# Altium PCB ledcube_v2.PcbDoc (part 12 of 18)
Units mil, origin at the board's own origin, x right, y up, seen from the top; angles counter-clockwise.
Board outline 3130 x 3300 mil, 2 copper layers (Top Layer, Bottom Layer); 188 components, 216 nets, 29515 pads, 250 vias.
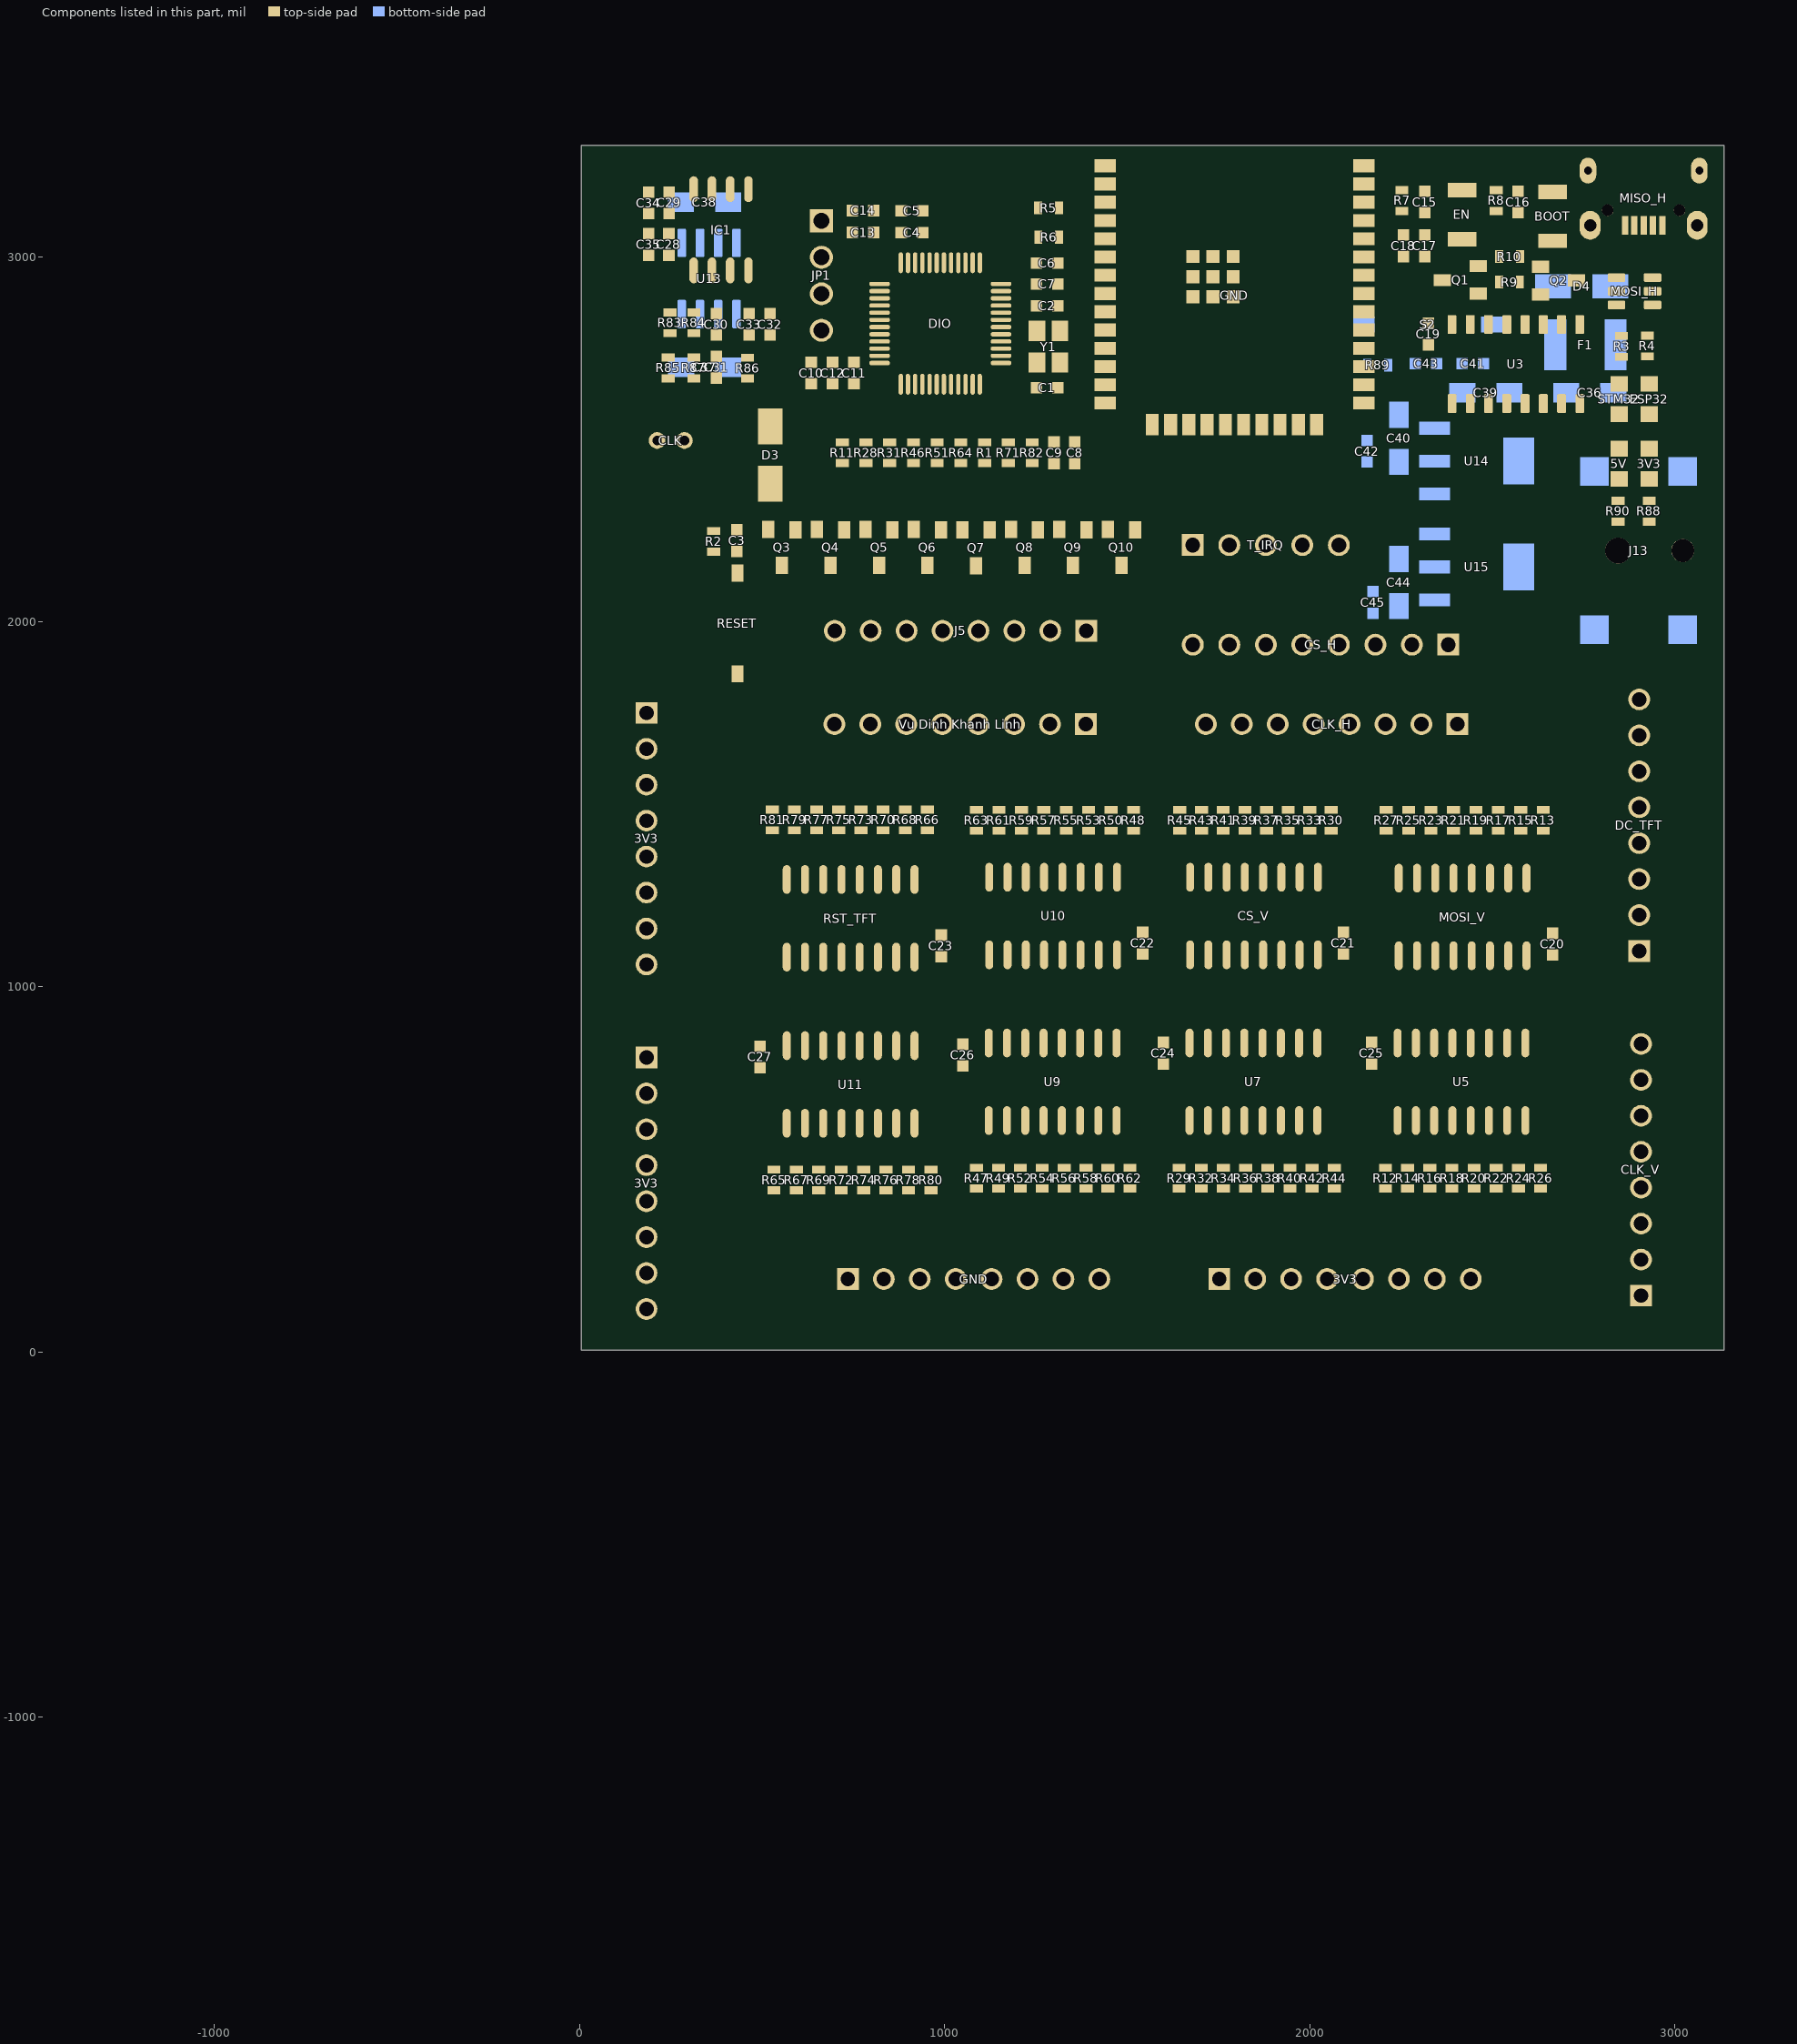
[diagram p11: the components of this part, seen from the top]

## Free pads (board coordinates) (continued)
  round 0 on Mech16: 1(-1372.03,-1736.73) 1(-1372.03,-1737.11) 1(-1372.03,-1737.11) 1(-1372.03,-1736.98) 1(-1372.03,-1736.98) 1(-1372.03,-1736.96) 1(-1372.03,-1736.96) 1(-1372.03,-1736.92) 1(-1372.03,-1736.92) 1(-1372.03,-1736.91) 1(-1372.03,-1736.91) 1(-1372.03,-1736.87) 1(-1372.03,-1736.87) 1(-1372.03,-1736.85) 1(-1372.03,-1736.85) 1(-1372.03,-1737.21) 1(-1372.03,-1737.21) 1(-1372.03,-1736.68) 1(-1372.03,-1736.68) 1(-1372.03,-1736.68) 1(-1372.03,-1736.68) 1(-1372.03,-1736.82) 1(-1372.03,-1736.82) 1(-1372.03,-1736.69) 1(-1372.03,-1736.69) 1(-1372.03,-1736.96) 1(-1372.03,-1736.96) 1(-1372.03,-1736.95) 1(-1372.03,-1736.95) 1(-1372.03,-1736.9) 1(-1372.03,-1736.9) 1(-1372.03,-1736.9) 1(-1372.03,-1736.9) 1(-1372.03,-1736.85) 1(-1372.03,-1736.85) 1(-1372.03,-1736.84) 1(-1372.03,-1736.84) 1(-1372.03,-1737.21) 1(-1372.03,-1737.21) 1(-1372.03,-1737.1) 1(-1372.03,-1737.1) 1(-1372.03,-1737.09) 1(-1372.03,-1737.09) 1(-1372.03,-1736.73) 1(-1372.03,-1736.73) 1(-1372.03,-1737.23) 1(-1372.03,-1737.23) 1(-1372.03,-1736.81) 1(-1372.03,-1736.81) 1(-1372.03,-1736.79) 1(-1372.03,-1736.79) 1(-1372.03,-1736.76) 1(-1372.03,-1736.76) 1(-1372.03,-1736.74) 1(-1372.03,-1736.74) 1(-1372.03,-1737.11) 1(-1372.03,-1737.11) 1(-1372.03,-1737.04) 1(-1372.03,-1737.04) 1(-1372.03,-1737.02) 1(-1372.03,-1737.02) 1(-1372.03,-1736.71) 1(-1372.03,-1736.71) 1(-1372.03,-1737.01) 1(-1372.03,-1737.01) 1(-1372.03,-1737.24) 1(-1372.03,-1737.24) 1(-1372.03,-1737.11) 1(-1372.03,-1737.11) 1(-1372.03,-1736.81) 1(-1372.03,-1736.81) 1(-1372.03,-1736.8) 1(-1372.03,-1736.8) 1(-1372.03,-1736.76) 1(-1372.03,-1736.76) 1(-1372.03,-1736.75) 1(-1372.03,-1736.75) 1(-1372.03,-1737.02) 1(-1372.03,-1737.02) 1(-1372.03,-1737.01) 1(-1372.03,-1737.01) 1(-1372.03,-1737.08) 1(-1372.03,-1737.08) 1(-1372.03,-1737.08) 1(-1372.03,-1737.08) 1(-1372.03,-1736.8) 1(-1372.03,-1736.8) 1(-1372.03,-1736.79) 1(-1372.03,-1736.79) 1(-1372.03,-1736.74) 1(-1372.03,-1736.74) 1(-1372.03,-1736.74) 1(-1372.03,-1736.74) 1(-1372.03,-1736.69) 1(-1372.03,-1736.69) 1(-1372.03,-1737.25) 1(-1372.03,-1737.25) 1(-1372.03,-1737.1) 1(-1372.03,-1737.1) 1(-1372.03,-1737.09) 1(-1372.03,-1737.09) 1(-1372.03,-1737.2) 1(-1372.03,-1737.2) 1(-1372.03,-1737.04) 1(-1372.03,-1737.04) 1(-1372.03,-1737.02) 1(-1372.03,-1737.02) 1(-1372.03,-1736.82) 1(-1372.03,-1736.82) 1(-1372.03,-1736.8) 1(-1372.03,-1736.8) 1(-1372.03,-1736.77) 1(-1372.03,-1736.77) 1(-1372.03,-1736.75) 1(-1372.03,-1736.75) 1(-1372.03,-1737.25) 1(-1372.03,-1737.25) 1(-1372.03,-1737.09) 1(-1372.03,-1737.09) 1(-1372.03,-1737.08) 1(-1372.03,-1737.08) 1(-1372.03,-1737.03) 1(-1372.03,-1737.03) 1(-1372.03,-1737.01) 1(-1372.03,-1737.01) 1(-1372.03,-1736.98) 1(-1372.03,-1736.98) 1(-1372.03,-1736.96) 1(-1372.03,-1736.96) 1(-1372.03,-1736.96) 1(-1372.03,-1736.96) 1(-1372.03,-1736.95) 1(-1372.03,-1736.95) 1(-1372.03,-1736.92) 1(-1372.03,-1736.92) 1(-1372.03,-1736.9) 1(-1372.03,-1736.9) 1(-1372.03,-1736.9) 1(-1372.03,-1736.9) 1(-1372.03,-1736.9) 1(-1372.03,-1736.9) 1(-1372.03,-1736.87) 1(-1372.03,-1736.87) 1(-1372.03,-1736.85) 1(-1372.03,-1736.85) 1(-1372.03,-1736.85) 1(-1372.03,-1736.85) 1(-1372.03,-1736.84) 1(-1372.03,-1736.84) 1(-1372.03,-1737.12) 1(-1372.03,-1737.12) 1(-1372.03,-1737.12) 1(-1372.03,-1737.12) 1(-1372.03,-1737.13) 1(-1372.03,-1737.13) 1(-1372.03,-1737.25) 1(-1372.03,-1737.25) 1(-1372.03,-1737.2) 1(-1372.03,-1737.2) 1(-1372.03,-1737.13) 1(-1372.03,-1737.13) 1(-1372.03,-1737.12) 1(-1372.03,-1737.12) 1(-1372.03,-1737.13) 1(-1372.03,-1737.13) 1(-1372.03,-1737.24) 1(-1372.03,-1737.24) 1(-1372.03,-1736.8) 1(-1372.03,-1736.8) 1(-1372.03,-1737.23) 1(-1372.03,-1737.23) 1(-1372.03,-1737.12) 1(-1372.03,-1737.12) 1(-1372.03,-1737.09) 1(-1372.03,-1737.09) 1(-1372.03,-1737.08) 1(-1372.03,-1737.08) 1(-1372.03,-1737.03) 1(-1372.03,-1737.03) 1(-1372.03,-1736.82) 1(-1372.03,-1736.82) 1(-1372.03,-1736.8) 1(-1372.03,-1736.8) 1(-1372.03,-1736.77) 1(-1372.03,-1736.77) 1(-1372.03,-1736.75) 1(-1372.03,-1736.75) 1(-1372.03,-1736.74) 1(-1372.03,-1736.74) 1(-1372.03,-1736.74) 1(-1372.03,-1736.74) 1(-1372.03,-1737.01) 1(-1372.03,-1737.01) 1(-1372.03,-1736.98) 1(-1372.03,-1736.98) 1(-1372.03,-1736.96) 1(-1372.03,-1736.96) 1(-1372.03,-1736.92) 1(-1372.03,-1736.92) 1(-1372.03,-1736.9) 1(-1372.03,-1736.9) 1(-1372.03,-1736.87) 1(-1372.03,-1736.87) 1(-1372.03,-1736.85) 1(-1372.03,-1736.85) 1(-1372.03,-1736.79) 1(-1372.03,-1736.79) 1(-1372.03,-1737.13) 1(-1372.03,-1737.13) 1(-1372.03,-1737.01) 1(-1372.03,-1737.01) 1(-1372.03,-1737.04) 1(-1372.03,-1737.04) 1(-1372.03,-1737.02) 1(-1372.03,-1737.02) 1(-1372.03,-1737.1) 1(-1372.03,-1737.1) 1(-1372.03,-1737.09) 1(-1372.03,-1737.09) 1(-1372.03,-1736.96) 1(-1372.03,-1736.96) 1(-1372.03,-1736.95) 1(-1372.03,-1736.95) 1(-1372.03,-1736.9) 1(-1372.03,-1736.9) 1(-1372.03,-1736.9) 1(-1372.03,-1736.9) 1(-1372.03,-1736.85) 1(-1372.03,-1736.85) 1(-1372.03,-1736.84) 1(-1372.03,-1736.84) 1(-1372.03,-1737.17) 1(-1372.03,-1737.17) 1(-1372.03,-1737.08) 1(-1372.03,-1737.08) 1(-1372.03,-1737.08) 1(-1372.03,-1737.08) 1(-1372.03,-1737.01) 1(-1372.03,-1737.01) 1(-1372.03,-1736.98) 1(-1372.03,-1736.98) 1(-1372.03,-1736.96) 1(-1372.03,-1736.96) 1(-1372.03,-1736.92) 1(-1372.03,-1736.92) 1(-1372.03,-1736.91) 1(-1372.03,-1736.91) 1(-1372.03,-1736.87) 1(-1372.03,-1736.87) 1(-1372.03,-1736.85) 1(-1372.03,-1736.85) 1(-1372.03,-1737.04) 1(-1372.03,-1737.04) 1(-1372.03,-1737.02) 1(-1372.03,-1737.02) 1(-1372.03,-1737.1) 1(-1372.03,-1737.1) 1(-1372.03,-1737.09) 1(-1372.03,-1737.09) 1(-1372.03,-1736.82) 1(-1372.03,-1736.82) 1(-1372.03,-1736.8) 1(-1372.03,-1736.8) 1(-1372.03,-1736.8) 1(-1372.03,-1736.8) 1(-1372.03,-1736.77) 1(-1372.03,-1736.77) 1(-1372.03,-1736.75) 1(-1372.03,-1736.75) 1(-1372.03,-1737.11) 1(-1372.03,-1737.11) 1(-1372.03,-1737.11) 1(-1372.03,-1737.11) 1(-1372.03,-1737.01) 1(-1372.03,-1737.01) 1(-1372.03,-1736.74) 1(-1372.03,-1736.74) 1(-1372.03,-1736.74) 1(-1372.03,-1736.74) 1(-1372.03,-1736.79) 1(-1372.03,-1736.79) 1(-1372.03,-1736.81) 1(-1372.03,-1736.81) 1(-1372.03,-1736.8) 1(-1372.03,-1736.8) 1(-1372.03,-1736.76) 1(-1372.03,-1736.76) 1(-1372.03,-1736.75) 1(-1372.03,-1736.75) 1(-1372.03,-1737.11) 1(-1372.03,-1737.11) 1(-1372.02,-1737.13) 1(-1372.02,-1737.13) 1(-1372.02,-1737.11) 1(-1372.02,-1737.11) 1(-1372.02,-1736.79) 1(-1372.02,-1736.79) 1(-1372.02,-1737.12) 1(-1372.02,-1737.12) 1(-1372.02,-1737.1) 1(-1372.02,-1737.1) 1(-1372.02,-1737.09) 1(-1372.02,-1737.09) 1(-1372.02,-1737.08) 1(-1372.02,-1737.08) 1(-1372.02,-1737.08) 1(-1372.02,-1737.08) 1(-1372.02,-1737.04) 1(-1372.02,-1737.04) 1(-1372.02,-1737.02) 1(-1372.02,-1737.02) 1(-1372.02,-1737.01) 1(-1372.02,-1737.01) 1(-1372.02,-1736.97) 1(-1372.02,-1736.97) 1(-1372.02,-1736.95) 1(-1372.02,-1736.95) 1(-1372.02,-1736.91) 1(-1372.02,-1736.91) 1(-1372.02,-1736.9) 1(-1372.02,-1736.9) 1(-1372.02,-1736.86) 1(-1372.02,-1736.86) 1(-1372.02,-1736.84) 1(-1372.02,-1736.84) 1(-1372.02,-1736.81) 1(-1372.02,-1736.81) 1(-1372.02,-1736.76) 1(-1372.02,-1736.76) 1(-1372.02,-1736.74) 1(-1372.02,-1736.74) 1(-1372.02,-1737.2) 1(-1372.02,-1737.2) 1(-1372.02,-1737.13) 1(-1372.02,-1737.13) 1(-1372.02,-1736.98) 1(-1372.02,-1736.98) 1(-1372.02,-1736.96) 1(-1372.02,-1736.96) 1(-1372.02,-1736.92) 1(-1372.02,-1736.92) 1(-1372.02,-1736.91) 1(-1372.02,-1736.91) 1(-1372.02,-1736.87) 1(-1372.02,-1736.87) 1(-1372.02,-1736.85) 1(-1372.02,-1736.85) 1(-1372.02,-1737.12) 1(-1372.02,-1737.12) 1(-1372.02,-1736.68) 1(-1372.02,-1736.68) 1(-1372.02,-1737.13) 1(-1372.02,-1737.13) 1(-1372.02,-1736.96) 1(-1372.02,-1736.96) 1(-1372.02,-1736.95) 1(-1372.02,-1736.95) 1(-1372.02,-1736.9) 1(-1372.02,-1736.9) 1(-1372.02,-1736.9) 1(-1372.02,-1736.9) 1(-1372.02,-1736.85) 1(-1372.02,-1736.85) 1(-1372.02,-1736.84) 1(-1372.02,-1736.84) 1(-1372.02,-1737.13) 1(-1372.02,-1737.13) 1(-1372.02,-1737.12) 1(-1372.02,-1737.12) 1(-1372.02,-1737.14) 1(-1372.02,-1737.14) 1(-1372.02,-1737.12) 1(-1372.02,-1737.12) 1(-1372.02,-1737.1) 1(-1372.02,-1737.1) 1(-1372.02,-1737.09) 1(-1372.02,-1737.09) 1(-1372.02,-1736.81) 1(-1372.02,-1736.81) 1(-1372.02,-1736.79) 1(-1372.02,-1736.79) 1(-1372.02,-1736.76) 1(-1372.02,-1736.76) 1(-1372.02,-1736.74) 1(-1372.02,-1736.74) 1(-1372.02,-1737.04) 1(-1372.02,-1737.04) 1(-1372.02,-1737.02) 1(-1372.02,-1737.02) 1(-1372.02,-1737.2) 1(-1372.02,-1737.2) 1(-1372.02,-1737.07) 1(-1372.02,-1737.07) 1(-1372.02,-1736.81) 1(-1372.02,-1736.81) 1(-1372.02,-1736.8) 1(-1372.02,-1736.8) 1(-1372.02,-1736.76) 1(-1372.02,-1736.76) 1(-1372.02,-1736.75) 1(-1372.02,-1736.75) 1(-1372.02,-1737.01) 1(-1372.02,-1737.01) 1(-1372.02,-1737.01) 1(-1372.02,-1737.01) 1(-1372.02,-1737.08) 1(-1372.02,-1737.08) 1(-1372.02,-1737.08) 1(-1372.02,-1737.08) 1(-1372.02,-1736.74) 1(-1372.02,-1736.74) 1(-1372.02,-1736.74) 1(-1372.02,-1736.74) 1(-1372.02,-1736.69) 1(-1372.02,-1736.69) 1(-1372.02,-1737.1) 1(-1372.02,-1737.1) 1(-1372.02,-1737.09) 1(-1372.02,-1737.09) 1(-1372.02,-1736.79) 1(-1372.02,-1736.79) 1(-1372.02,-1736.79) 1(-1372.02,-1736.79) 1(-1372.02,-1737.04) 1(-1372.02,-1737.04) 1(-1372.02,-1737.02) 1(-1372.02,-1737.02) 1(-1372.02,-1737.01) 1(-1372.02,-1737.01) 1(-1372.02,-1736.82) 1(-1372.02,-1736.82) 1(-1372.02,-1736.8) 1(-1372.02,-1736.8) 1(-1372.02,-1736.77) 1(-1372.02,-1736.77) 1(-1372.02,-1736.75) 1(-1372.02,-1736.75) 1(-1372.02,-1737.09) 1(-1372.02,-1737.09) 1(-1372.02,-1737.08) 1(-1372.02,-1737.08) 1(-1372.02,-1737.03) 1(-1372.02,-1737.03) 1(-1372.02,-1737.01) 1(-1372.02,-1737.01) 1(-1372.02,-1736.98) 1(-1372.02,-1736.98) 1(-1372.02,-1736.96) 1(-1372.02,-1736.96) 1(-1372.02,-1736.96) 1(-1372.02,-1736.96) 1(-1372.02,-1736.95) 1(-1372.02,-1736.95) 1(-1372.02,-1736.92) 1(-1372.02,-1736.92) 1(-1372.02,-1736.9) 1(-1372.02,-1736.9) 1(-1372.02,-1736.9) 1(-1372.02,-1736.9) 1(-1372.02,-1736.9) 1(-1372.02,-1736.9) 1(-1372.02,-1736.87) 1(-1372.02,-1736.87) 1(-1372.02,-1736.85) 1(-1372.02,-1736.85) 1(-1372.02,-1736.85) 1(-1372.02,-1736.85) 1(-1372.02,-1736.84) 1(-1372.02,-1736.84) 1(-1372.02,-1736.72) 1(-1372.02,-1736.72) 1(-1372.02,-1736.69) 1(-1372.02,-1736.69) 1(-1372.02,-1736.72) 1(-1372.02,-1736.72) 1(-1372.02,-1737.11) 1(-1372.02,-1737.11) 1(-1372.02,-1736.72) 1(-1372.02,-1736.72) 1(-1372.02,-1737.11) 1(-1372.02,-1737.11) 1(-1372.02,-1737.2) 1(-1372.02,-1737.2) 1(-1372.02,-1736.71) 1(-1372.02,-1736.71) 1(-1372.02,-1737.09) 1(-1372.02,-1737.09) 1(-1372.02,-1737.08) 1(-1372.02,-1737.08) 1(-1372.02,-1737.03) 1(-1372.02,-1737.03) 1(-1372.02,-1737.01) 1(-1372.02,-1737.01) 1(-1372.02,-1736.82) 1(-1372.02,-1736.82) 1(-1372.02,-1736.8) 1(-1372.02,-1736.8) 1(-1372.02,-1736.79) 1(-1372.02,-1736.79) 1(-1372.02,-1736.79) 1(-1372.02,-1736.79) 1(-1372.02,-1736.77) 1(-1372.02,-1736.77) 1(-1372.02,-1736.75) 1(-1372.02,-1736.75) 1(-1372.02,-1736.74) 1(-1372.02,-1736.74) 1(-1372.02,-1736.74) 1(-1372.02,-1736.74) 1(-1372.02,-1736.98) 1(-1372.02,-1736.98) 1(-1372.02,-1736.96) 1(-1372.02,-1736.96) 1(-1372.02,-1736.92) 1(-1372.02,-1736.92) 1(-1372.02,-1736.9) 1(-1372.02,-1736.9) 1(-1372.02,-1736.87) 1(-1372.02,-1736.87) 1(-1372.02,-1736.85) 1(-1372.02,-1736.85) 1(-1372.02,-1737.04) 1(-1372.02,-1737.04) 1(-1372.02,-1737.02) 1(-1372.02,-1737.02) 1(-1372.02,-1737.1) 1(-1372.02,-1737.1) 1(-1372.02,-1737.09) 1(-1372.02,-1737.09) 1(-1372.02,-1736.96) 1(-1372.02,-1736.96) 1(-1372.02,-1736.95) 1(-1372.02,-1736.95) 1(-1372.02,-1736.9) 1(-1372.02,-1736.9) 1(-1372.02,-1736.9) 1(-1372.02,-1736.9) 1(-1372.02,-1736.85) 1(-1372.02,-1736.85) 1(-1372.02,-1736.84) 1(-1372.02,-1736.84) 1(-1372.02,-1736.72) 1(-1372.02,-1736.72) 1(-1372.02,-1737.13) 1(-1372.02,-1737.13) 1(-1372.02,-1737.12) 1(-1372.02,-1737.12) 1(-1372.02,-1737.08) 1(-1372.02,-1737.08) 1(-1372.02,-1737.08) 1(-1372.02,-1737.08) 1(-1372.02,-1737.17) 1(-1372.02,-1737.17) 1(-1372.02,-1737.01) 1(-1372.02,-1737.01) 1(-1372.02,-1737.01) 1(-1372.02,-1737.01) 1(-1372.02,-1736.98) 1(-1372.02,-1736.98) 1(-1372.02,-1736.96) 1(-1372.02,-1736.96) 1(-1372.02,-1736.92) 1(-1372.02,-1736.92) 1(-1372.02,-1736.91) 1(-1372.02,-1736.91) 1(-1372.02,-1736.87) 1(-1372.02,-1736.87) 1(-1372.02,-1736.85) 1(-1372.02,-1736.85) 1(-1372.02,-1737.12) 1(-1372.02,-1737.12) 1(-1372.02,-1736.82) 1(-1372.02,-1736.82) 1(-1372.02,-1736.8) 1(-1372.02,-1736.8) 1(-1372.02,-1736.77) 1(-1372.02,-1736.77) 1(-1372.02,-1736.75) 1(-1372.02,-1736.75) 1(-1372.02,-1737.04) 1(-1372.02,-1737.04) 1(-1372.02,-1737.02) 1(-1372.02,-1737.02) 1(-1372.02,-1737.1) 1(-1372.02,-1737.1) 1(-1372.02,-1737.09) 1(-1372.02,-1737.09) 1(-1372.02,-1736.67) 1(-1372.02,-1736.67) 1(-1372.02,-1737.13) 1(-1372.02,-1737.13) 1(-1372.02,-1736.79) 1(-1372.02,-1736.79) 1(-1372.02,-1736.79) 1(-1372.02,-1736.79) 1(-1372.02,-1736.74) 1(-1372.02,-1736.74) 1(-1372.02,-1736.74) 1(-1372.02,-1736.74) 1(-1372.02,-1736.71) 1(-1372.02,-1736.71) 1(-1372.02,-1736.81) 1(-1372.02,-1736.81) 1(-1372.02,-1736.8) 1(-1372.02,-1736.8) 1(-1372.02,-1736.76) 1(-1372.02,-1736.76) 1(-1372.02,-1736.75) 1(-1372.02,-1736.75) 1(-1372.02,-1737.11) 1(-1372.02,-1737.11) 1(-1372.02,-1736.92) 1(-1372.02,-1736.92) 1(-1372.02,-1736.87) 1(-1372.02,-1736.87) 1(-1372.02,-1736.84) 1(-1372.02,-1736.84) 1(-1372.01,-1736.73) 1(-1372.01,-1736.73) 1(-1372.01,-1737.12) 1(-1372.01,-1737.12) 1(-1372.01,-1736.97) 1(-1372.01,-1736.97) 1(-1372.01,-1736.95) 1(-1372.01,-1736.95) 1(-1372.01,-1736.91) 1(-1372.01,-1736.91) 1(-1372.01,-1736.9) 1(-1372.01,-1736.9) 1(-1372.01,-1736.86) 1(-1372.01,-1736.86) 1(-1372.01,-1736.84) 1(-1372.01,-1736.84) 1(-1372.01,-1736.81) 1(-1372.01,-1736.81) 1(-1372.01,-1736.79) 1(-1372.01,-1736.79) 1(-1372.01,-1736.76) 1(-1372.01,-1736.76) 1(-1372.01,-1736.74) 1(-1372.01,-1736.74) 1(-1372.01,-1737.11) 1(-1372.01,-1737.11) 1(-1372.01,-1737.13) 1(-1372.01,-1737.13) 1(-1372.01,-1737.12) 1(-1372.01,-1737.12) 1(-1372.01,-1736.98) 1(-1372.01,-1736.98) 1(-1372.01,-1736.96) 1(-1372.01,-1736.96) 1(-1372.01,-1736.92) 1(-1372.01,-1736.92) 1(-1372.01,-1736.91) 1(-1372.01,-1736.91) 1(-1372.01,-1736.87) 1(-1372.01,-1736.87) 1(-1372.01,-1736.85) 1(-1372.01,-1736.85) 1(-1372.01,-1737.12) 1(-1372.01,-1737.12) 1(-1372.01,-1737.1) 1(-1372.01,-1737.1) 1(-1372.01,-1737.09) 1(-1372.01,-1737.09) 1(-1372.01,-1737.08) 1(-1372.01,-1737.08) 1(-1372.01,-1737.08) 1(-1372.01,-1737.08) 1(-1372.01,-1737.04) 1(-1372.01,-1737.04) 1(-1372.01,-1737.02) 1(-1372.01,-1737.02) 1(-1372.01,-1737.01) 1(-1372.01,-1737.01) 1(-1372.01,-1737.01) 1(-1372.01,-1737.01) 1(-1372.01,-1736.96) 1(-1372.01,-1736.96) 1(-1372.01,-1736.95) 1(-1372.01,-1736.95) 1(-1372.01,-1736.9) 1(-1372.01,-1736.9) 1(-1372.01,-1736.9) 1(-1372.01,-1736.9) 1(-1372.01,-1736.85) 1(-1372.01,-1736.85) 1(-1372.01,-1736.84) 1(-1372.01,-1736.84) 1(-1372.01,-1736.98) 1(-1372.01,-1736.98) 1(-1372.01,-1737.11) 1(-1372.01,-1737.11) 1(-1372.01,-1736.77) 1(-1372.01,-1736.77) 1(-1372.01,-1736.82) 1(-1372.01,-1736.82) 1(-1372.01,-1736.81) 1(-1372.01,-1736.81) 1(-1372.01,-1736.79) 1(-1372.01,-1736.79) 1(-1372.01,-1736.76) 1(-1372.01,-1736.76) 1(-1372.01,-1736.74) 1(-1372.01,-1736.74) 1(-1372.01,-1736.68) 1(-1372.01,-1736.68) 1(-1372.01,-1737.13) 1(-1372.01,-1737.13) 1(-1372.01,-1737.12) 1(-1372.01,-1737.12) 1(-1372.01,-1736.81) 1(-1372.01,-1736.81) 1(-1372.01,-1736.8) 1(-1372.01,-1736.8) 1(-1372.01,-1736.76) 1(-1372.01,-1736.76) 1(-1372.01,-1736.75) 1(-1372.01,-1736.75) 1(-1372.01,-1736.89) 1(-1372.01,-1736.89) 1(-1372.01,-1737.28) 1(-1372.01,-1737.28) 1(-1372.01,-1736.74) 1(-1372.01,-1736.74) 1(-1372.01,-1736.74) 1(-1372.01,-1736.74) 1(-1372.01,-1736.79) 1(-1372.01,-1736.79) 1(-1372.01,-1736.79) 1(-1372.01,-1736.79) 1(-1372.01,-1737.13) 1(-1372.01,-1737.13) 1(-1372.01,-1737.1) 1(-1372.01,-1737.1) 1(-1372.01,-1737.09) 1(-1372.01,-1737.09) 1(-1372.01,-1736.73) 1(-1372.01,-1736.73) 1(-1372.01,-1737.12) 1(-1372.01,-1737.12) 1(-1372.01,-1737.04) 1(-1372.01,-1737.04) 1(-1372.01,-1737.02) 1(-1372.01,-1737.02) 1(-1372.01,-1736.68) 1(-1372.01,-1736.68) 1(-1372.01,-1736.82) 1(-1372.01,-1736.82) 1(-1372.01,-1736.8) 1(-1372.01,-1736.8) 1(-1372.01,-1736.77) 1(-1372.01,-1736.77) 1(-1372.01,-1736.75) 1(-1372.01,-1736.75) 1(-1372.01,-1736.98) 1(-1372.01,-1736.98) 1(-1372.01,-1736.96) 1(-1372.01,-1736.96) 1(-1372.01,-1736.96) 1(-1372.01,-1736.96) 1(-1372.01,-1736.95) 1(-1372.01,-1736.95) 1(-1372.01,-1736.92) 1(-1372.01,-1736.92) 1(-1372.01,-1736.9) 1(-1372.01,-1736.9) 1(-1372.01,-1736.9) 1(-1372.01,-1736.9) 1(-1372.01,-1736.9) 1(-1372.01,-1736.9) 1(-1372.01,-1736.87) 1(-1372.01,-1736.87) 1(-1372.01,-1736.85) 1(-1372.01,-1736.85) 1(-1372.01,-1736.85) 1(-1372.01,-1736.85) 1(-1372.01,-1736.84) 1(-1372.01,-1736.84) 1(-1372.01,-1736.7) 1(-1372.01,-1736.7) 1(-1372.01,-1737.28) 1(-1372.01,-1737.28) 1(-1372.01,-1737.13) 1(-1372.01,-1737.13) 1(-1372.01,-1737.12) 1(-1372.01,-1737.12) 1(-1372.01,-1737.01) 1(-1372.01,-1737.01) 1(-1372.01,-1737.01) 1(-1372.01,-1737.01) 1(-1372.01,-1737.19) 1(-1372.01,-1737.19) 1(-1372.01,-1737.08) 1(-1372.01,-1737.08) 1(-1372.01,-1737.08) 1(-1372.01,-1737.08) 1(-1372.01,-1737.25) 1(-1372.01,-1737.25) 1(-1372.01,-1737.21) 1(-1372.01,-1737.21) 1(-1372.01,-1737.12) 1(-1372.01,-1737.12) 1(-1372.01,-1736.7) 1(-1372.01,-1736.7) 1(-1372.01,-1737.1) 1(-1372.01,-1737.1) 1(-1372.01,-1737.09) 1(-1372.01,-1737.09) 1(-1372.01,-1737.2) 1(-1372.01,-1737.2) 1(-1372.01,-1737.04) 1(-1372.01,-1737.04) 1(-1372.01,-1737.02) 1(-1372.01,-1737.02) 1(-1372.01,-1737.13) 1(-1372.01,-1737.13) 1(-1372.01,-1736.74) 1(-1372.01,-1736.74) 1(-1372.01,-1737.14) 1(-1372.01,-1737.14) 1(-1372.01,-1737.1) 1(-1372.01,-1737.1) 1(-1372.01,-1737.09) 1(-1372.01,-1737.09) 1(-1372.01,-1737.08) 1(-1372.01,-1737.08) 1(-1372.01,-1737.03) 1(-1372.01,-1737.03) 1(-1372.01,-1737.01) 1(-1372.01,-1737.01) 1(-1372.01,-1736.82) 1(-1372.01,-1736.82) 1(-1372.01,-1736.8) 1(-1372.01,-1736.8) 1(-1372.01,-1736.79) 1(-1372.01,-1736.79) 1(-1372.01,-1736.79) 1(-1372.01,-1736.79) 1(-1372.01,-1736.77) 1(-1372.01,-1736.77) 1(-1372.01,-1736.75) 1(-1372.01,-1736.75) 1(-1372.01,-1736.74) 1(-1372.01,-1736.74) 1(-1372.01,-1736.74) 1(-1372.01,-1736.74) 1(-1372.01,-1736.98) 1(-1372.01,-1736.98) 1(-1372.01,-1736.96) 1(-1372.01,-1736.96) 1(-1372.01,-1736.92) 1(-1372.01,-1736.92) 1(-1372.01,-1736.9) 1(-1372.01,-1736.9) 1(-1372.01,-1736.87) 1(-1372.01,-1736.87) 1(-1372.01,-1736.85) 1(-1372.01,-1736.85) 1(-1372.01,-1737.12) 1(-1372.01,-1737.12) 1(-1372.01,-1736.96) 1(-1372.01,-1736.96) 1(-1372.01,-1736.95) 1(-1372.01,-1736.95) 1(-1372.01,-1736.9) 1(-1372.01,-1736.9) 1(-1372.01,-1736.9) 1(-1372.01,-1736.9) 1(-1372.01,-1736.85) 1(-1372.01,-1736.85) 1(-1372.01,-1736.84) 1(-1372.01,-1736.84) 1(-1372.01,-1737.04) 1(-1372.01,-1737.04) 1(-1372.01,-1737.01) 1(-1372.01,-1737.01) 1(-1372.01,-1737.13) 1(-1372.01,-1737.13) 1(-1372.01,-1736.98) 1(-1372.01,-1736.98) 1(-1372.01,-1736.96) 1(-1372.01,-1736.96) 1(-1372.01,-1736.92) 1(-1372.01,-1736.92) 1(-1372.01,-1736.91) 1(-1372.01,-1736.91) 1(-1372.01,-1736.87) 1(-1372.01,-1736.87) 1(-1372.01,-1736.85) 1(-1372.01,-1736.85) 1(-1372.01,-1737.12) 1(-1372.01,-1737.12) 1(-1372.01,-1736.7) 1(-1372.01,-1736.7) 1(-1372.01,-1737.09) 1(-1372.01,-1737.09) 1(-1372.01,-1737.08) 1(-1372.01,-1737.08) 1(-1372.01,-1737.03) 1(-1372.01,-1737.03) 1(-1372.01,-1737.01) 1(-1372.01,-1737.01) 1(-1372.01,-1736.97) 1(-1372.01,-1736.97) 1(-1372.01,-1736.95) 1(-1372.01,-1736.95) 1(-1372.01,-1736.91) 1(-1372.01,-1736.91) 1(-1372.01,-1736.9) 1(-1372.01,-1736.9) 1(-1372.01,-1736.86) 1(-1372.01,-1736.86) 1(-1372.01,-1736.84) 1(-1372.01,-1736.84) 1(-1372.01,-1736.82) 1(-1372.01,-1736.82) 1(-1372.01,-1736.8) 1(-1372.01,-1736.8) 1(-1372.01,-1736.77) 1(-1372.01,-1736.77) 1(-1372.01,-1736.75) 1(-1372.01,-1736.75) 1(-1372.01,-1737.01) 1(-1372.01,-1737.01) 1(-1372.01,-1737.04) 1(-1372.01,-1737.04) 1(-1372.01,-1737.02) 1(-1372.01,-1737.02) 1(-1372.01,-1737.1) 1(-1372.01,-1737.1) 1(-1372.01,-1737.09) 1(-1372.01,-1737.09) 1(-1372.01,-1737.01) 1(-1372.01,-1737.01) 1(-1372.01,-1736.79) 1(-1372.01,-1736.79) 1(-1372.01,-1736.79) 1(-1372.01,-1736.79) 1(-1372.01,-1737.08) 1(-1372.01,-1737.08) 1(-1372.01,-1737.08) 1(-1372.01,-1737.08) 1(-1372.01,-1736.95) 1(-1372.01,-1736.95) 1(-1372.01,-1736.74) 1(-1372.01,-1736.74) 1(-1372.01,-1736.74) 1(-1372.01,-1736.74) 1(-1372.01,-1736.72) 1(-1372.01,-1736.72) 1(-1372.01,-1737.01) 1(-1372.01,-1737.01) 1(-1372.01,-1736.68) 1(-1372.01,-1736.68) 1(-1372.01,-1736.81) 1(-1372.01,-1736.81) 1(-1372.01,-1736.8) 1(-1372.01,-1736.8) 1(-1372.01,-1736.76) 1(-1372.01,-1736.76) 1(-1372.01,-1736.75) 1(-1372.01,-1736.75) 1(-1372.01,-1736.72) 1(-1372.01,-1736.72) 1(-1372.01,-1737.17) 1(-1372.01,-1737.17) 1(-1372.01,-1737.04) 1(-1372.01,-1737.04) 1(-1372.01,-1737.02) 1(-1372.01,-1737.02) 1(-1372.01,-1737.1) 1(-1372.01,-1737.1) 1(-1372.01,-1737.09) 1(-1372.01,-1737.09) 1(-1372.01,-1736.97) 1(-1372.01,-1736.97) 1(-1372.01,-1736.95) 1(-1372.01,-1736.95) 1(-1372.01,-1736.91) 1(-1372.01,-1736.91) 1(-1372.01,-1736.9) 1(-1372.01,-1736.9) 1(-1372.01,-1736.86) 1(-1372.01,-1736.86) 1(-1372.01,-1736.84) 1(-1372.01,-1736.84) 1(-1372.01,-1736.81) 1(-1372.01,-1736.81) 1(-1372.01,-1736.79) 1(-1372.01,-1736.79) 1(-1372.01,-1736.76) 1(-1372.01,-1736.76) 1(-1372.01,-1736.74) 1(-1372.01,-1736.74) 1(-1372.01,-1736.7) 1(-1372.01,-1736.7) 1(-1372.01,-1736.67) 1(-1372.01,-1736.67) 1(-1372.01,-1736.66) 1(-1372.01,-1736.66) 1(-1372.01,-1736.64) 1(-1372.01,-1736.64) 1(-1372,-1736.68) 1(-1372,-1736.68) 1(-1372,-1736.98) 1(-1372,-1736.98) 1(-1372,-1736.96) 1(-1372,-1736.96) 1(-1372,-1736.92) 1(-1372,-1736.92) 1(-1372,-1736.9) 1(-1372,-1736.9) 1(-1372,-1736.87) 1(-1372,-1736.87) 1(-1372,-1736.85) 1(-1372,-1736.85) 1(-1372,-1736.72) 1(-1372,-1736.72) 1(-1372,-1736.96) 1(-1372,-1736.96) 1(-1372,-1736.95) 1(-1372,-1736.95) 1(-1372,-1736.85) 1(-1372,-1736.85) 1(-1372,-1736.84) 1(-1372,-1736.84) 1(-1372,-1736.9) 1(-1372,-1736.9) 1(-1372,-1736.9) 1(-1372,-1736.9) 1(-1372,-1736.7) 1(-1372,-1736.7) 1(-1372,-1736.98) 1(-1372,-1736.98) 1(-1372,-1736.96) 1(-1372,-1736.96) 1(-1372,-1736.87) 1(-1372,-1736.87) 1(-1372,-1736.85) 1(-1372,-1736.85) 1(-1372,-1737.1) 1(-1372,-1737.1) 1(-1372,-1737.09) 1(-1372,-1737.09) 1(-1372,-1737.08) 1(-1372,-1737.08) 1(-1372,-1737.08) 1(-1372,-1737.08) 1(-1372,-1737.04) 1(-1372,-1737.04) 1(-1372,-1737.02) 1(-1372,-1737.02) 1(-1372,-1737.01) 1(-1372,-1737.01) 1(-1372,-1736.81) 1(-1372,-1736.81) 1(-1372,-1736.79) 1(-1372,-1736.79) 1(-1372,-1736.76) 1(-1372,-1736.76) 1(-1372,-1736.74) 1(-1372,-1736.74) 1(-1372,-1736.67) 1(-1372,-1736.67) 1(-1372,-1736.65) 1(-1372,-1736.65) 1(-1372,-1736.67) 1(-1372,-1736.67) 1(-1372,-1736.66) 1(-1372,-1736.66) 1(-1372,-1736.92) 1(-1372,-1736.92) 1(-1372,-1736.9) 1(-1372,-1736.9) 1(-1372,-1736.8) 1(-1372,-1736.8) 1(-1372,-1736.76) 1(-1372,-1736.76) 1(-1372,-1736.75) 1(-1372,-1736.75) 1(-1372,-1737.12) 1(-1372,-1737.12) 1(-1372,-1737.01) 1(-1372,-1737.01) 1(-1372,-1736.81) 1(-1372,-1736.81) 1(-1372,-1736.66) 1(-1372,-1736.66) 1(-1372,-1736.74) 1(-1372,-1736.74) 1(-1372,-1736.74) 1(-1372,-1736.74) 1(-1372,-1736.72) 1(-1372,-1736.72) 1(-1372,-1736.65) 1(-1372,-1736.65) 1(-1372,-1736.79) 1(-1372,-1736.79) 1(-1372,-1736.79) 1(-1372,-1736.79) 1(-1372,-1736.73) 1(-1372,-1736.73) 1(-1372,-1737.13) 1(-1372,-1737.13) 1(-1372,-1737.12) 1(-1372,-1737.12) 1(-1372,-1736.67) 1(-1372,-1736.67) 1(-1372,-1736.65) 1(-1372,-1736.65) 1(-1372,-1736.72) 1(-1372,-1736.72) 1(-1372,-1736.82) 1(-1372,-1736.82) 1(-1372,-1736.8) 1(-1372,-1736.8) 1(-1372,-1736.77) 1(-1372,-1736.77) 1(-1372,-1736.75) 1(-1372,-1736.75) 1(-1372,-1737.1) 1(-1372,-1737.1) 1(-1372,-1737.09) 1(-1372,-1737.09) 1(-1372,-1736.98) 1(-1372,-1736.98) 1(-1372,-1736.96) 1(-1372,-1736.96) 1(-1372,-1736.96) 1(-1372,-1736.96) 1(-1372,-1736.95) 1(-1372,-1736.95) 1(-1372,-1736.87) 1(-1372,-1736.87) 1(-1372,-1736.85) 1(-1372,-1736.85) 1(-1372,-1736.85) 1(-1372,-1736.85) 1(-1372,-1736.84) 1(-1372,-1736.84) 1(-1372,-1736.68) 1(-1372,-1736.68) 1(-1372,-1737.04) 1(-1372,-1737.04) 1(-1372,-1737.02) 1(-1372,-1737.02) 1(-1372,-1737.2) 1(-1372,-1737.2) 1(-1372,-1736.66) 1(-1372,-1736.66) 1(-1372,-1737.01) 1(-1372,-1737.01) 1(-1372,-1737.13) 1(-1372,-1737.13) 1(-1372,-1737.12) 1(-1372,-1737.12) 1(-1372,-1737.12) 1(-1372,-1737.12) 1(-1372,-1737.08) 1(-1372,-1737.08) 1(-1372,-1737.08) 1(-1372,-1737.08) 1(-1372,-1736.92) 1(-1372,-1736.92) 1(-1372,-1736.9) 1(-1372,-1736.9) 1(-1372,-1736.9) 1(-1372,-1736.9) 1(-1372,-1736.9) 1(-1372,-1736.9) 1(-1372,-1737.1) 1(-1372,-1737.1) 1(-1372,-1737.09) 1(-1372,-1737.09) 1(-1372,-1737.01) 1(-1372,-1737.01) 1(-1372,-1736.65) 1(-1372,-1736.65) 1(-1372,-1737.13) 1(-1372,-1737.13) 1(-1372,-1737.12) 1(-1372,-1737.12) 1(-1372,-1737.01) 1(-1372,-1737.01) 1(-1372,-1737.09) 1(-1372,-1737.09) 1(-1372,-1737.08) 1(-1372,-1737.08) 1(-1372,-1737.03) 1(-1372,-1737.03) 1(-1372,-1736.82) 1(-1372,-1736.82) 1(-1372,-1736.8) 1(-1372,-1736.8) 1(-1372,-1736.79) 1(-1372,-1736.79) 1(-1372,-1736.79) 1(-1372,-1736.79) 1(-1372,-1736.77) 1(-1372,-1736.77) 1(-1372,-1736.75) 1(-1372,-1736.75) 1(-1372,-1736.74) 1(-1372,-1736.74) 1(-1372,-1736.74) 1(-1372,-1736.74) 1(-1372,-1736.66) 1(-1372,-1736.66) 1(-1372,-1736.98) 1(-1372,-1736.98) 1(-1372,-1736.96) 1(-1372,-1736.96) 1(-1372,-1736.87) 1(-1372,-1736.87) 1(-1372,-1736.85) 1(-1372,-1736.85) 1(-1372,-1736.72) 1(-1372,-1736.72) 1(-1372,-1736.72) 1(-1372,-1736.72) 1(-1372,-1736.67) 1(-1372,-1736.67) 1(-1372,-1736.66) 1(-1372,-1736.66) 1(-1372,-1736.96) 1(-1372,-1736.96) 1(-1372,-1736.95) 1(-1372,-1736.95) 1(-1372,-1736.85) 1(-1372,-1736.85) 1(-1372,-1736.84) 1(-1372,-1736.84) 1(-1372,-1736.73) 1(-1372,-1736.73) 1(-1372,-1736.66) 1(-1372,-1736.66) 1(-1372,-1737.13) 1(-1372,-1737.13) 1(-1372,-1737.12) 1(-1372,-1737.12) 1(-1372,-1736.72) 1(-1372,-1736.72) 1(-1372,-1736.7) 1(-1372,-1736.7) 1(-1372,-1736.69) 1(-1372,-1736.69) 1(-1372,-1736.98) 1(-1372,-1736.98) 1(-1372,-1736.96) 1(-1372,-1736.96) 1(-1372,-1736.87) 1(-1372,-1736.87) 1(-1372,-1736.85) 1(-1372,-1736.85) 1(-1372,-1737.13) 1(-1372,-1737.13) 1(-1372,-1737.12) 1(-1372,-1737.12) 1(-1372,-1736.65) 1(-1372,-1736.65) 1(-1372,-1736.65) 1(-1372,-1736.65) 1(-1372,-1736.92) 1(-1372,-1736.92) 1(-1372,-1736.9) 1(-1372,-1736.9) 1(-1372,-1737.2) 1(-1372,-1737.2) 1(-1372,-1736.66) 1(-1372,-1736.66) 1(-1372,-1737.11) 1(-1372,-1737.11) 1(-1372,-1737.09) 1(-1372,-1737.09) 1(-1372,-1737.08) 1(-1372,-1737.08) 1(-1372,-1737.03) 1(-1372,-1737.03) 1(-1372,-1737.01) 1(-1372,-1737.01) 1(-1372,-1736.97) 1(-1372,-1736.97) 1(-1372,-1736.95) 1(-1372,-1736.95) 1(-1372,-1736.86) 1(-1372,-1736.86) 1(-1372,-1736.84) 1(-1372,-1736.84) 1(-1372,-1736.77) 1(-1372,-1736.77) 1(-1372,-1736.75) 1(-1372,-1736.75) 1(-1372,-1736.72) 1(-1372,-1736.72) 1(-1372,-1736.82) 1(-1372,-1736.82) 1(-1372,-1736.8) 1(-1372,-1736.8) 1(-1372,-1736.66) 1(-1372,-1736.66) 1(-1372,-1736.65) 1(-1372,-1736.65) 1(-1372,-1737.02) 1(-1372,-1737.02) 1(-1372,-1737.01) 1(-1372,-1737.01) 1(-1372,-1736.9) 1(-1372,-1736.9) 1(-1372,-1736.9) 1(-1372,-1736.9) 1(-1372,-1736.68) 1(-1372,-1736.68) 1(-1372,-1737.08) 1(-1372,-1737.08) 1(-1372,-1737.04) 1(-1372,-1737.04) 1(-1372,-1737.08) 1(-1372,-1737.08) 1(-1372,-1736.79) 1(-1372,-1736.79) 1(-1372,-1736.79) 1(-1372,-1736.79) 1(-1372,-1736.66) 1(-1372,-1736.66) 1(-1372,-1737.1) 1(-1372,-1737.1) 1(-1372,-1737.09) 1(-1372,-1737.09) 1(-1372,-1736.74) 1(-1372,-1736.74) 1(-1372,-1736.74) 1(-1372,-1736.74) 1(-1372,-1736.68) 1(-1372,-1736.68) 1(-1372,-1737.13) 1(-1372,-1737.13) 1(-1372,-1737.12) 1(-1372,-1737.12) 1(-1372,-1737.02) 1(-1372,-1737.02) 1(-1372,-1737.13) 1(-1372,-1737.13) 1(-1372,-1737.12) 1(-1372,-1737.12) 1(-1372,-1737.11) 1(-1372,-1737.11) 1(-1372,-1736.92) 1(-1372,-1736.92) 1(-1372,-1736.9) 1(-1372,-1736.9) 1(-1372,-1736.8) 1(-1372,-1736.8) 1(-1372,-1736.76) 1(-1372,-1736.76) 1(-1372,-1736.75) 1(-1372,-1736.75) 1(-1372,-1736.82) 1(-1372,-1736.82) 1(-1372,-1737.11) 1(-1372,-1737.11) 1(-1372,-1737.01) 1(-1372,-1737.01) 1(-1372,-1736.66) 1(-1372,-1736.66) 1(-1372,-1736.65) 1(-1372,-1736.65) 1(-1372,-1737.01) 1(-1372,-1737.01) 1(-1372,-1737.2) 1(-1372,-1737.2) 1(-1372,-1737.13) 1(-1372,-1737.13) 1(-1372,-1737.12) 1(-1372,-1737.12) 1(-1372,-1736.97) 1(-1372,-1736.97) 1(-1372,-1736.95) 1(-1372,-1736.95) 1(-1372,-1736.91) 1(-1372,-1736.91) 1(-1372,-1736.9) 1(-1372,-1736.9) 1(-1372,-1736.86) 1(-1372,-1736.86) 1(-1372,-1736.81) 1(-1372,-1736.81) 1(-1372,-1736.79) 1(-1372,-1736.79) 1(-1372,-1736.76) 1(-1372,-1736.76) 1(-1372,-1736.74) 1(-1372,-1736.74) 1(-1372,-1736.73) 1(-1372,-1736.73) 1(-1372,-1737.04) 1(-1372,-1737.04) 1(-1371.99,-1736.84) 1(-1371.99,-1736.84) 1(-1371.99,-1736.73) 1(-1371.99,-1736.73) 1(-1371.99,-1737.2) 1(-1371.99,-1737.2) 1(-1371.99,-1736.98) 1(-1371.99,-1736.98) 1(-1371.99,-1736.96) 1(-1371.99,-1736.96) 1(-1371.99,-1736.84) 1(-1371.99,-1736.84) 1(-1371.99,-1736.72) 1(-1371.99,-1736.72) 1(-1371.99,-1736.66) 1(-1371.99,-1736.66) 1(-1371.99,-1737.17) 1(-1371.99,-1737.17) 1(-1371.99,-1736.66) 1(-1371.99,-1736.66) 1(-1371.99,-1737.02) 1(-1371.99,-1737.02) 1(-1371.99,-1736.96) 1(-1371.99,-1736.96) 1(-1371.99,-1736.95) 1(-1371.99,-1736.95) 1(-1371.99,-1736.71) 1(-1371.99,-1736.71) 1(-1371.99,-1737.25) 1(-1371.99,-1737.25) 1(-1371.99,-1737.23) 1(-1371.99,-1737.23) 1(-1371.99,-1737.21) 1(-1371.99,-1737.21) 1(-1371.99,-1737.09) 1(-1371.99,-1737.09) 1(-1371.99,-1737.08) 1(-1371.99,-1737.08) 1(-1371.99,-1736.91) 1(-1371.99,-1736.91) 1(-1371.99,-1736.9) 1(-1371.99,-1736.9) 1(-1371.99,-1736.81) 1(-1371.99,-1736.81) 1(-1371.99,-1736.76) 1(-1371.99,-1736.76) 1(-1371.99,-1736.74) 1(-1371.99,-1736.74) 1(-1371.99,-1736.79) 1(-1371.99,-1736.79) 1(-1371.99,-1736.85) 1(-1371.99,-1736.85) 1(-1371.99,-1736.98) 1(-1371.99,-1736.98) 1(-1371.99,-1736.96) 1(-1371.99,-1736.96) 1(-1371.99,-1736.87) 1(-1371.99,-1736.87) 1(-1371.99,-1736.85) 1(-1371.99,-1736.85) 1(-1371.99,-1736.79) 1(-1371.99,-1736.79) 1(-1371.99,-1737.11) 1(-1371.99,-1737.11) 1(-1371.99,-1737.2) 1(-1371.99,-1737.2) 1(-1371.99,-1736.79) 1(-1371.99,-1736.79) 1(-1371.99,-1736.92) 1(-1371.99,-1736.92) 1(-1371.99,-1736.91) 1(-1371.99,-1736.91) 1(-1371.99,-1736.82) 1(-1371.99,-1736.82) 1(-1371.99,-1736.8) 1(-1371.99,-1736.8) 1(-1371.99,-1736.76) 1(-1371.99,-1736.76) 1(-1371.99,-1736.75) 1(-1371.99,-1736.75) 1(-1371.99,-1736.65) 1(-1371.99,-1736.65) 1(-1371.99,-1737.11) 1(-1371.99,-1737.11) 1(-1371.99,-1736.67) 1(-1371.99,-1736.67) 1(-1371.99,-1736.66) 1(-1371.99,-1736.66) 1(-1371.99,-1736.65) 1(-1371.99,-1736.65) 1(-1371.99,-1737.1) 1(-1371.99,-1737.1) 1(-1371.99,-1737.09) 1(-1371.99,-1737.09) 1(-1371.99,-1737.04) 1(-1371.99,-1737.04) 1(-1371.99,-1737.01) 1(-1371.99,-1737.01) 1(-1371.99,-1736.9) 1(-1371.99,-1736.9) 1(-1371.99,-1736.9) 1(-1371.99,-1736.9) 1(-1371.99,-1736.74) 1(-1371.99,-1736.74) 1(-1371.99,-1736.74) 1(-1371.99,-1736.74) 1(-1371.99,-1736.65) 1(-1371.99,-1736.65) 1(-1371.99,-1736.92) 1(-1371.99,-1736.92) 1(-1371.99,-1736.9) 1(-1371.99,-1736.9) 1(-1371.99,-1736.82) 1(-1371.99,-1736.82) 1(-1371.99,-1736.8) 1(-1371.99,-1736.8) 1(-1371.99,-1736.8) 1(-1371.99,-1736.8) 1(-1371.99,-1736.77) 1(-1371.99,-1736.77) 1(-1371.99,-1736.75) 1(-1371.99,-1736.75) 1(-1371.99,-1737.23) 1(-1371.99,-1737.23) 1(-1371.99,-1736.66) 1(-1371.99,-1736.66) 1(-1371.99,-1736.84) 1(-1371.99,-1736.84) 1(-1371.99,-1736.72) 1(-1371.99,-1736.72) 1(-1371.99,-1736.72) 1(-1371.99,-1736.72) 1(-1371.99,-1737.21) 1(-1371.99,-1737.21) 1(-1371.99,-1737.24) 1(-1371.99,-1737.24) 1(-1371.99,-1737.14) 1(-1371.99,-1737.14) 1(-1371.99,-1736.73) 1(-1371.99,-1736.73) 1(-1371.99,-1737.08) 1(-1371.99,-1737.08) 1(-1371.99,-1737.02) 1(-1371.99,-1737.02) 1(-1371.99,-1737.02) 1(-1371.99,-1737.02) 1(-1371.99,-1737.2) 1(-1371.99,-1737.2) 1(-1371.99,-1737.09) 1(-1371.99,-1737.09) 1(-1371.99,-1736.98) 1(-1371.99,-1736.98) 1(-1371.99,-1736.96) 1(-1371.99,-1736.96) 1(-1371.99,-1736.96) 1(-1371.99,-1736.96) 1(-1371.99,-1736.95) 1(-1371.99,-1736.95) 1(-1371.99,-1736.87) 1(-1371.99,-1736.87) 1(-1371.99,-1736.85) 1(-1371.99,-1736.85) 1(-1371.99,-1736.71) 1(-1371.99,-1736.71) 1(-1371.99,-1736.66) 1(-1371.99,-1736.66) 1(-1371.99,-1737.21) 1(-1371.99,-1737.21) 1(-1371.99,-1737.2) 1(-1371.99,-1737.2) 1(-1371.99,-1736.65) 1(-1371.99,-1736.65) 1(-1371.99,-1737.25) 1(-1371.99,-1737.25) 1(-1371.99,-1736.85) 1(-1371.99,-1736.85) 1(-1371.99,-1737.04) 1(-1371.99,-1737.04) 1(-1371.99,-1736.65) 1(-1371.99,-1736.65) 1(-1371.99,-1737.08) 1(-1371.99,-1737.08) 1(-1371.99,-1736.92) 1(-1371.99,-1736.92) 1(-1371.99,-1736.9) 1(-1371.99,-1736.9) 1(-1371.99,-1736.9) 1(-1371.99,-1736.9) 1(-1371.99,-1736.9) 1(-1371.99,-1736.9) 1(-1371.99,-1736.82) 1(-1371.99,-1736.82) 1(-1371.99,-1736.8) 1(-1371.99,-1736.8) 1(-1371.99,-1736.77) 1(-1371.99,-1736.77) 1(-1371.99,-1736.75) 1(-1371.99,-1736.75) 1(-1371.99,-1736.74) 1(-1371.99,-1736.74) 1(-1371.99,-1736.74) 1(-1371.99,-1736.74) 1(-1371.99,-1737.02) 1(-1371.99,-1737.02) 1(-1371.99,-1737.11) 1(-1371.99,-1737.11) 1(-1371.99,-1737.08) 1(-1371.99,-1737.08) 1(-1371.99,-1736.8) 1(-1371.99,-1736.8) 1(-1371.99,-1737.01) 1(-1371.99,-1737.01) 1(-1371.99,-1736.79) 1(-1371.99,-1736.79) 1(-1371.99,-1737.2) 1(-1371.99,-1737.2) 1(-1371.99,-1737.25) 1(-1371.99,-1737.25) 1(-1371.99,-1737.2) 1(-1371.99,-1737.2) 1(-1371.99,-1737.1) 1(-1371.99,-1737.1) 1(-1371.99,-1737.09) 1(-1371.99,-1737.09) 1(-1371.99,-1737.04) 1(-1371.99,-1737.04) 1(-1371.99,-1737.02) 1(-1371.99,-1737.02) 1(-1371.99,-1737.2) 1(-1371.99,-1737.2) 1(-1371.99,-1736.98) 1(-1371.99,-1736.98) 1(-1371.99,-1736.96) 1(-1371.99,-1736.96) 1(-1371.99,-1736.87) 1(-1371.99,-1736.87) 1(-1371.99,-1736.85) 1(-1371.99,-1736.85) 1(-1371.99,-1736.84) 1(-1371.99,-1736.84) 1(-1371.99,-1737.12) 1(-1371.99,-1737.12) 1(-1371.99,-1737.09) 1(-1371.99,-1737.09) 1(-1371.99,-1737.08) 1(-1371.99,-1737.08) 1(-1371.99,-1737.03) 1(-1371.99,-1737.03) 1(-1371.99,-1737.01) 1(-1371.99,-1737.01) 1(-1371.99,-1736.92) 1(-1371.99,-1736.92) 1(-1371.99,-1736.9) 1(-1371.99,-1736.9) 1(-1371.99,-1736.82) 1(-1371.99,-1736.82) 1(-1371.99,-1736.8) 1(-1371.99,-1736.8) 1(-1371.99,-1736.77) 1(-1371.99,-1736.77) 1(-1371.99,-1736.75) 1(-1371.99,-1736.75) 1(-1371.99,-1737.11) 1(-1371.99,-1737.11) 1(-1371.99,-1737.17) 1(-1371.99,-1737.17) 1(-1371.99,-1737.25) 1(-1371.99,-1737.25) 1(-1371.99,-1736.72) 1(-1371.99,-1736.72) 1(-1371.99,-1737.11) 1(-1371.99,-1737.11) 1(-1371.99,-1736.96) 1(-1371.99,-1736.96) 1(-1371.99,-1736.95) 1(-1371.99,-1736.95) 1(-1371.99,-1736.72) 1(-1371.99,-1736.72) 1(-1371.99,-1737.13) 1(-1371.99,-1737.13) 1(-1371.99,-1737.12) 1(-1371.99,-1737.12) 1(-1371.99,-1736.9) 1(-1371.99,-1736.9) 1(-1371.99,-1736.9) 1(-1371.99,-1736.9) 1(-1371.99,-1736.74) 1(-1371.99,-1736.74) 1(-1371.99,-1736.74) 1(-1371.99,-1736.74) 1(-1371.99,-1736.8) 1(-1371.99,-1736.8) 1(-1371.99,-1737.21) 1(-1371.99,-1737.21) 1(-1371.99,-1736.79) 1(-1371.99,-1736.79) 1(-1371.99,-1737.11) 1(-1371.99,-1737.11) 1(-1371.99,-1737.09) 1(-1371.99,-1737.09) 1(-1371.99,-1737.08) 1(-1371.99,-1737.08) 1(-1371.99,-1736.87) 1(-1371.99,-1736.87) 1(-1371.99,-1736.85) 1(-1371.99,-1736.85) 1(-1371.99,-1736.98) 1(-1371.99,-1736.98) 1(-1371.99,-1736.96) 1(-1371.99,-1736.96) 1(-1371.99,-1736.92) 1(-1371.99,-1736.92) 1(-1371.99,-1736.91) 1(-1371.99,-1736.91) 1(-1371.99,-1736.82) 1(-1371.99,-1736.82) 1(-1371.99,-1736.8) 1(-1371.99,-1736.8) 1(-1371.99,-1736.76) 1(-1371.99,-1736.76) 1(-1371.99,-1736.75) 1(-1371.99,-1736.75) 1(-1371.99,-1736.69) 1(-1371.99,-1736.69) 1(-1371.99,-1736.69) 1(-1371.99,-1736.69) 1(-1371.99,-1737.29) 1(-1371.99,-1737.29) 1(-1371.99,-1736.85) 1(-1371.99,-1736.85) 1(-1371.99,-1736.79) 1(-1371.99,-1736.79) 1(-1371.99,-1736.72) 1(-1371.99,-1736.72) 1(-1371.99,-1737.23) 1(-1371.99,-1737.23) 1(-1371.99,-1737.13) 1(-1371.99,-1737.13) 1(-1371.99,-1737.12) 1(-1371.99,-1737.12) 1(-1371.99,-1737.09) 1(-1371.99,-1737.09) 1(-1371.99,-1737.03) 1(-1371.99,-1737.03) 1(-1371.99,-1737.01) 1(-1371.99,-1737.01) 1(-1371.99,-1736.97) 1(-1371.99,-1736.97) 1(-1371.99,-1736.95) 1(-1371.99,-1736.95) 1(-1371.99,-1736.91) 1(-1371.99,-1736.91) 1(-1371.99,-1736.9) 1(-1371.99,-1736.9) 1(-1371.99,-1736.86) 1(-1371.99,-1736.86) 1(-1371.99,-1736.81) 1(-1371.99,-1736.81) 1(-1371.99,-1736.79) 1(-1371.99,-1736.79) 1(-1371.99,-1736.76) 1(-1371.99,-1736.76) 1(-1371.99,-1736.74) 1(-1371.99,-1736.74) 1(-1371.98,-1737.04) 1(-1371.98,-1737.04) 1(-1371.98,-1737.02) 1(-1371.98,-1737.02) 1(-1371.98,-1736.93) 1(-1371.98,-1736.93) 1(-1371.98,-1736.87) 1(-1371.98,-1736.87) 1(-1371.98,-1736.84) 1(-1371.98,-1736.84) 1(-1371.98,-1737.1) 1(-1371.98,-1737.1) 1(-1371.98,-1737.09) 1(-1371.98,-1737.09) 1(-1371.98,-1737.02) 1(-1371.98,-1737.02) 1(-1371.98,-1737.01) 1(-1371.98,-1737.01) 1(-1371.98,-1737.01) 1(-1371.98,-1737.01) 1(-1371.98,-1737.04) 1(-1371.98,-1737.04) 1(-1371.98,-1737.02) 1(-1371.98,-1737.02) 1(-1371.98,-1737.13) 1(-1371.98,-1737.13) 1(-1371.98,-1737.12) 1(-1371.98,-1737.12) 1(-1371.98,-1736.97) 1(-1371.98,-1736.97) 1(-1371.98,-1736.96) 1(-1371.98,-1736.96) 1(-1371.98,-1736.92) 1(-1371.98,-1736.92) 1(-1371.98,-1736.9) 1(-1371.98,-1736.9) 1(-1371.98,-1736.86) 1(-1371.98,-1736.86) 1(-1371.98,-1736.85) 1(-1371.98,-1736.85) 1(-1371.98,-1736.81) 1(-1371.98,-1736.81) 1(-1371.98,-1736.79) 1(-1371.98,-1736.79) 1(-1371.98,-1736.76) 1(-1371.98,-1736.76) 1(-1371.98,-1736.74) 1(-1371.98,-1736.74) 1(-1371.98,-1737.11) 1(-1371.98,-1737.11) 1(-1371.98,-1736.98) 1(-1371.98,-1736.98) 1(-1371.98,-1736.82) 1(-1371.98,-1736.82) 1(-1371.98,-1736.98) 1(-1371.98,-1736.98) 1(-1371.98,-1736.96) 1(-1371.98,-1736.96) 1(-1371.98,-1736.92) 1(-1371.98,-1736.92) 1(-1371.98,-1736.91) 1(-1371.98,-1736.91) 1(-1371.98,-1736.87) 1(-1371.98,-1736.87) 1(-1371.98,-1736.85) 1(-1371.98,-1736.85) 1(-1371.98,-1736.82) 1(-1371.98,-1736.82) 1(-1371.98,-1736.8) 1(-1371.98,-1736.8) 1(-1371.98,-1736.77) 1(-1371.98,-1736.77) 1(-1371.98,-1736.77) 1(-1371.98,-1736.77) 1(-1371.98,-1736.75) 1(-1371.98,-1736.75) 1(-1371.98,-1736.96) 1(-1371.98,-1736.96) 1(-1371.98,-1736.95) 1(-1371.98,-1736.95) 1(-1371.98,-1736.9) 1(-1371.98,-1736.9) 1(-1371.98,-1736.9) 1(-1371.98,-1736.9) 1(-1371.98,-1736.85) 1(-1371.98,-1736.85) 1(-1371.98,-1736.84) 1(-1371.98,-1736.84) 1(-1371.98,-1736.8) 1(-1371.98,-1736.8) 1(-1371.98,-1737.09) 1(-1371.98,-1737.09) 1(-1371.98,-1737.08) 1(-1371.98,-1737.08) 1(-1371.98,-1737.11) 1(-1371.98,-1737.11) 1(-1371.98,-1737.17) 1(-1371.98,-1737.17) 1(-1371.98,-1736.79) 1(-1371.98,-1736.79) 1(-1371.98,-1736.75) 1(-1371.98,-1736.75) 1(-1371.98,-1736.74) 1(-1371.98,-1736.74) 1(-1371.98,-1736.68) 1(-1371.98,-1736.68) 1(-1371.98,-1737.11) 1(-1371.98,-1737.11) 1(-1371.98,-1736.98) 1(-1371.98,-1736.98) 1(-1371.98,-1736.96) 1(-1371.98,-1736.96) 1(-1371.98,-1736.92) 1(-1371.98,-1736.92) 1(-1371.98,-1736.91) 1(-1371.98,-1736.91) 1(-1371.98,-1736.87) 1(-1371.98,-1736.87) 1(-1371.98,-1736.85) 1(-1371.98,-1736.85) 1(-1371.98,-1737.16) 1(-1371.98,-1737.16) 1(-1371.98,-1736.89) 1(-1371.98,-1736.89) 1(-1371.98,-1736.82) 1(-1371.98,-1736.82) 1(-1371.98,-1737.13) 1(-1371.98,-1737.13) 1(-1371.98,-1737.12) 1(-1371.98,-1737.12) 1(-1371.98,-1736.8) 1(-1371.98,-1736.8) 1(-1371.98,-1736.77) 1(-1371.98,-1736.77) 1(-1371.98,-1736.75) 1(-1371.98,-1736.75) 1(-1371.98,-1737.1) 1(-1371.98,-1737.1) 1(-1371.98,-1737.09) 1(-1371.98,-1737.09) 1(-1371.98,-1737.04) 1(-1371.98,-1737.04) 1(-1371.98,-1737.02) 1(-1371.98,-1737.02) 1(-1371.98,-1737.02) 1(-1371.98,-1737.02) 1(-1371.98,-1737.01) 1(-1371.98,-1737.01) 1(-1371.98,-1737.14) 1(-1371.98,-1737.14) 1(-1371.98,-1736.74) 1(-1371.98,-1736.74) 1(-1371.98,-1736.98) 1(-1371.98,-1736.98) 1(-1371.98,-1736.96) 1(-1371.98,-1736.96) 1(-1371.98,-1736.96) 1(-1371.98,-1736.96) 1(-1371.98,-1736.95) 1(-1371.98,-1736.95) 1(-1371.98,-1736.92) 1(-1371.98,-1736.92) 1(-1371.98,-1736.91) 1(-1371.98,-1736.91) 1(-1371.98,-1736.9) 1(-1371.98,-1736.9) 1(-1371.98,-1736.9) 1(-1371.98,-1736.9) 1(-1371.98,-1736.87) 1(-1371.98,-1736.87) 1(-1371.98,-1736.85) 1(-1371.98,-1736.85) 1(-1371.98,-1736.85) 1(-1371.98,-1736.85) 1(-1371.98,-1736.84) 1(-1371.98,-1736.84) 1(-1371.98,-1737.13) 1(-1371.98,-1737.13) 1(-1371.98,-1737.12) 1(-1371.98,-1737.12) 1(-1371.98,-1737.11) 1(-1371.98,-1737.11) 1(-1371.98,-1736.82) 1(-1371.98,-1736.82) 1(-1371.98,-1737.25) 1(-1371.98,-1737.25) 1(-1371.98,-1737.22) 1(-1371.98,-1737.22) 1(-1371.98,-1737.12) 1(-1371.98,-1737.12) 1(-1371.98,-1737.11) 1(-1371.98,-1737.11) 1(-1371.98,-1737.1) 1(-1371.98,-1737.1) 1(-1371.98,-1737.09) 1(-1371.98,-1737.09) 1(-1371.98,-1736.79) 1(-1371.98,-1736.79) 1(-1371.98,-1736.77) 1(-1371.98,-1736.77) 1(-1371.98,-1736.75) 1(-1371.98,-1736.75) 1(-1371.98,-1736.75) 1(-1371.98,-1736.75) 1(-1371.98,-1736.74) 1(-1371.98,-1736.74) 1(-1371.98,-1737.17) 1(-1371.98,-1737.17) 1(-1371.98,-1737.15) 1(-1371.98,-1737.15) 1(-1371.98,-1737.04) 1(-1371.98,-1737.04) 1(-1371.98,-1737.02) 1(-1371.98,-1737.02) 1(-1371.98,-1736.8) 1(-1371.98,-1736.8) 1(-1371.98,-1737.11) 1(-1371.98,-1737.11) 1(-1371.98,-1736.98) 1(-1371.98,-1736.98) 1(-1371.98,-1736.96) 1(-1371.98,-1736.96) 1(-1371.98,-1736.92) 1(-1371.98,-1736.92) 1(-1371.98,-1736.91) 1(-1371.98,-1736.91) 1(-1371.98,-1736.87) 1(-1371.98,-1736.87) 1(-1371.98,-1736.85) 1(-1371.98,-1736.85) 1(-1371.98,-1737.18) 1(-1371.98,-1737.18) 1(-1371.98,-1737.14) 1(-1371.98,-1737.14) 1(-1371.98,-1737.2) 1(-1371.98,-1737.2) 1(-1371.98,-1737.16) 1(-1371.98,-1737.16) 1(-1371.98,-1737.02) 1(-1371.98,-1737.02) 1(-1371.98,-1737.01) 1(-1371.98,-1737.01) 1(-1371.98,-1736.8) 1(-1371.98,-1736.8) 1(-1371.98,-1737.17) 1(-1371.98,-1737.17) 1(-1371.98,-1737.11) 1(-1371.98,-1737.11) 1(-1371.98,-1737.09) 1(-1371.98,-1737.09) 1(-1371.98,-1737.08) 1(-1371.98,-1737.08) 1(-1371.98,-1736.96) 1(-1371.98,-1736.96) 1(-1371.98,-1736.95) 1(-1371.98,-1736.95) 1(-1371.98,-1736.9) 1(-1371.98,-1736.9) 1(-1371.98,-1736.9) 1(-1371.98,-1736.9) 1(-1371.98,-1736.85) 1(-1371.98,-1736.85) 1(-1371.98,-1736.84) 1(-1371.98,-1736.84) 1(-1371.98,-1737.1) 1(-1371.98,-1737.1) 1(-1371.98,-1737.09) 1(-1371.98,-1737.09) 1(-1371.98,-1736.82) 1(-1371.98,-1736.82) 1(-1371.98,-1737.04) 1(-1371.98,-1737.04) 1(-1371.98,-1737.02) 1(-1371.98,-1737.02) 1(-1371.98,-1736.98) 1(-1371.98,-1736.98) 1(-1371.98,-1736.96) 1(-1371.98,-1736.96) 1(-1371.98,-1736.92) 1(-1371.98,-1736.92) 1(-1371.98,-1736.91) 1(-1371.98,-1736.91) 1(-1371.98,-1736.87) 1(-1371.98,-1736.87) 1(-1371.98,-1736.85) 1(-1371.98,-1736.85) 1(-1371.98,-1737.14) 1(-1371.98,-1737.14) 1(-1371.98,-1737.09) 1(-1371.98,-1737.09) 1(-1371.98,-1737.08) 1(-1371.98,-1737.08) 1(-1371.98,-1737.03) 1(-1371.98,-1737.03) 1(-1371.98,-1737.01) 1(-1371.98,-1737.01) 1(-1371.98,-1736.97) 1(-1371.98,-1736.97) 1(-1371.98,-1736.96) 1(-1371.98,-1736.96) 1(-1371.98,-1736.92) 1(-1371.98,-1736.92) 1(-1371.98,-1736.9) 1(-1371.98,-1736.9) 1(-1371.98,-1736.86) 1(-1371.98,-1736.86) 1(-1371.98,-1736.85) 1(-1371.98,-1736.85) 1(-1371.98,-1736.77) 1(-1371.98,-1736.77) 1(-1371.98,-1736.75) 1(-1371.98,-1736.75) 1(-1371.98,-1737.18) 1(-1371.98,-1737.18) 1(-1371.98,-1737.18) 1(-1371.98,-1737.18) 1(-1371.98,-1736.8) 1(-1371.98,-1736.8) 1(-1371.98,-1736.82) 1(-1371.98,-1736.82) 1(-1371.98,-1736.75) 1(-1371.98,-1736.75) 1(-1371.98,-1736.74) 1(-1371.98,-1736.74) 1(-1371.98,-1737.16) 1(-1371.98,-1737.16) 1(-1371.98,-1737.16) 1(-1371.98,-1737.16) 1(-1371.98,-1736.79) 1(-1371.98,-1736.79) 1(-1371.98,-1737.18) 1(-1371.98,-1737.18) 1(-1371.98,-1736.8) 1(-1371.98,-1736.8) 1(-1371.98,-1736.77) 1(-1371.98,-1736.77) 1(-1371.98,-1736.75) 1(-1371.98,-1736.75) 1(-1371.98,-1736.8) 1(-1371.98,-1736.8) 1(-1371.98,-1736.81) 1(-1371.98,-1736.81) 1(-1371.98,-1737.11) 1(-1371.98,-1737.11) 1(-1371.98,-1737.1) 1(-1371.98,-1737.1) 1(-1371.98,-1737.09) 1(-1371.98,-1737.09) 1(-1371.98,-1737.08) 1(-1371.98,-1737.08) 1(-1371.98,-1737.04) 1(-1371.98,-1737.04) 1(-1371.98,-1737.02) 1(-1371.98,-1737.02) 1(-1371.98,-1737.01) 1(-1371.98,-1737.01) 1(-1371.98,-1736.98) 1(-1371.98,-1736.98) 1(-1371.98,-1736.97) 1(-1371.98,-1736.97) 1(-1371.98,-1736.95) 1(-1371.98,-1736.95) 1(-1371.98,-1736.93) 1(-1371.98,-1736.93) 1(-1371.98,-1736.91) 1(-1371.98,-1736.91) 1(-1371.98,-1736.9) 1(-1371.98,-1736.9) 1(-1371.98,-1736.87) 1(-1371.98,-1736.87) 1(-1371.98,-1736.86) 1(-1371.98,-1736.86) 1(-1371.98,-1736.84) 1(-1371.98,-1736.84) 1(-1371.98,-1736.8) 1(-1371.98,-1736.8) 1(-1371.98,-1736.76) 1(-1371.98,-1736.76) 1(-1371.98,-1736.74) 1(-1371.98,-1736.74) 1(-1371.98,-1736.74) 1(-1371.98,-1736.74) 1(-1371.98,-1736.72) 1(-1371.98,-1736.72) 1(-1371.98,-1736.69) 1(-1371.98,-1736.69) 1(-1371.97,-1736.68) 1(-1371.97,-1736.68) 1(-1371.97,-1737.16) 1(-1371.97,-1737.16) 1(-1371.97,-1737.11) 1(-1371.97,-1737.11) 1(-1371.97,-1737.16) 1(-1371.97,-1737.16) 1(-1371.97,-1737.13) 1(-1371.97,-1737.13) 1(-1371.97,-1736.82) 1(-1371.97,-1736.82) 1(-1371.97,-1736.81) 1(-1371.97,-1736.81) 1(-1371.97,-1736.79) 1(-1371.97,-1736.79) 1(-1371.97,-1736.77) 1(-1371.97,-1736.77) 1(-1371.97,-1736.73) 1(-1371.97,-1736.73) 1(-1371.97,-1736.69) 1(-1371.97,-1736.69) 1(-1371.97,-1737.25) 1(-1371.97,-1737.25) 1(-1371.97,-1737.14) 1(-1371.97,-1737.14) 1(-1371.97,-1737.11) 1(-1371.97,-1737.11) 1(-1371.97,-1737.12) 1(-1371.97,-1737.12) 1(-1371.97,-1736.68) 1(-1371.97,-1736.68) 1(-1371.97,-1737.11) 1(-1371.97,-1737.11) 1(-1371.97,-1737.14) 1(-1371.97,-1737.14) 1(-1371.97,-1737.12) 1(-1371.97,-1737.12) 1(-1371.97,-1737.11) 1(-1371.97,-1737.11) 1(-1371.97,-1737.13) 1(-1371.97,-1737.13) 1(-1371.97,-1737.15) 1(-1371.97,-1737.15) 1(-1371.97,-1737.12) 1(-1371.97,-1737.12) 1(-1371.97,-1737.19) 1(-1371.97,-1737.19) 1(-1371.97,-1737.25) 1(-1371.97,-1737.25) 1(-1371.97,-1737.12) 1(-1371.97,-1737.12) 1(-1371.97,-1737.11) 1(-1371.97,-1737.11) 1(-1371.97,-1737.11) 1(-1371.97,-1737.11) 1(-1371.97,-1737.13) 1(-1371.97,-1737.13) 1(-1371.97,-1737.25) 1(-1371.97,-1737.25) 1(-1371.97,-1737.23) 1(-1371.97,-1737.23) 1(-1371.97,-1737.21) 1(-1371.97,-1737.21) 1(-1371.97,-1737.21) 1(-1371.97,-1737.21) 1(-1371.97,-1737.16) 1(-1371.97,-1737.16) 1(-1371.97,-1737.15) 1(-1371.97,-1737.15) 1(-1371.97,-1737.14) 1(-1371.97,-1737.14) 1(-1371.97,-1737.18) 1(-1371.97,-1737.18) 1(-1371.97,-1737.11) 1(-1371.97,-1737.11) 1(-1371.97,-1737.18) 1(-1371.97,-1737.18) 1(-1371.97,-1737.13) 1(-1371.97,-1737.13) 1(-1371.97,-1737.16) 1(-1371.97,-1737.16) 1(-1371.96,-1737.19) 1(-1371.96,-1737.19) 1(-1371.96,-1737.21) 1(-1371.96,-1737.21) 1(-1371.96,-1737.21) 1(-1371.96,-1737.21) 1(-1371.96,-1737.11) 1(-1371.96,-1737.11) 1(-1371.96,-1737.11) 1(-1371.96,-1737.11) 1(-1371.96,-1737.18) 1(-1371.96,-1737.18) 1(-1371.96,-1737.16) 1(-1371.96,-1737.16) 1(-1371.96,-1737.11) 1(-1371.96,-1737.11) 1(-1371.96,-1737.17) 1(-1371.96,-1737.17) 1(-1371.96,-1737.21) 1(-1371.96,-1737.21) 1(-1371.96,-1737.17) 1(-1371.96,-1737.17) 1(-1371.96,-1737.2) 1(-1371.96,-1737.2) 1(-1371.96,-1737.13) 1(-1371.96,-1737.13) 1(-1371.96,-1737.12) 1(-1371.96,-1737.12) 1(-1371.96,-1737.11) 1(-1371.96,-1737.11) 1(-1371.96,-1737.13) 1(-1371.96,-1737.13) 1(-1371.96,-1737.12) 1(-1371.96,-1737.12) 1(-1371.96,-1737.13) 1(-1371.96,-1737.13) 1(-1371.96,-1737.18) 1(-1371.96,-1737.18) 1(-1371.96,-1737.14) 1(-1371.96,-1737.14) 1(-1371.96,-1737.11) 1(-1371.96,-1737.11) 1(-1371.96,-1737.13) 1(-1371.96,-1737.13) 1(-1371.96,-1737.12) 1(-1371.96,-1737.12) 1(-1371.96,-1736.7) 1(-1371.96,-1736.7) 1(-1371.96,-1737.1) 1(-1371.96,-1737.1) 1(-1371.96,-1737.09) 1(-1371.96,-1737.09) 1(-1371.96,-1737.04) 1(-1371.96,-1737.04) 1(-1371.96,-1737.03) 1(-1371.96,-1737.03) 1(-1371.96,-1737.01) 1(-1371.96,-1737.01) 1(-1371.96,-1736.93) 1(-1371.96,-1736.93) 1(-1371.96,-1736.91) 1(-1371.96,-1736.91) 1(-1371.96,-1736.86) 1(-1371.96,-1736.86) 1(-1371.96,-1736.82) 1(-1371.96,-1736.82) 1(-1371.96,-1736.81) 1(-1371.96,-1736.81) 1(-1371.96,-1737.18) 1(-1371.96,-1737.18) 1(-1371.96,-1737.18) 1(-1371.96,-1737.18) 1(-1371.96,-1737.08) 1(-1371.96,-1737.08) 1(-1371.96,-1736.97) 1(-1371.96,-1736.97) 1(-1371.96,-1736.74) 1(-1371.96,-1736.74) 1(-1371.96,-1736.96) 1(-1371.96,-1736.96) 1(-1371.96,-1736.9) 1(-1371.96,-1736.9) 1(-1371.96,-1736.85) 1(-1371.96,-1736.85) 1(-1371.96,-1736.99) 1(-1371.96,-1736.99) 1(-1371.96,-1736.77) 1(-1371.96,-1736.77) 1(-1371.96,-1737.13) 1(-1371.96,-1737.13) 1(-1371.96,-1737.12) 1(-1371.96,-1737.12) 1(-1371.96,-1737.11) 1(-1371.96,-1737.11) 1(-1371.96,-1736.95) 1(-1371.96,-1736.95) 1(-1371.96,-1737.13) 1(-1371.96,-1737.13) 1(-1371.96,-1737.12) 1(-1371.96,-1737.12) 1(-1371.96,-1737.08) 1(-1371.96,-1737.08) 1(-1371.96,-1736.85) 1(-1371.96,-1736.85) 1(-1371.96,-1736.9) 1(-1371.96,-1736.9) 1(-1371.96,-1736.7) 1(-1371.96,-1736.7) 1(-1371.96,-1737.1) 1(-1371.96,-1737.1) 1(-1371.96,-1737.08) 1(-1371.96,-1737.08) 1(-1371.96,-1737.03) 1(-1371.96,-1737.03) 1(-1371.96,-1736.97) 1(-1371.96,-1736.97) 1(-1371.96,-1736.96) 1(-1371.96,-1736.96) 1(-1371.96,-1736.92) 1(-1371.96,-1736.92) 1(-1371.96,-1736.9) 1(-1371.96,-1736.9) 1(-1371.96,-1736.86) 1(-1371.96,-1736.86) 1(-1371.96,-1736.81) 1(-1371.96,-1736.81) 1(-1371.96,-1736.8)